# Altium PCB gateway.PcbDoc
Units mil, origin at the board's own origin, x right, y up, seen from the top; angles counter-clockwise.
Board outline 2775 x 2425 mil, 2 copper layers (Top Layer, Bottom Layer); 5 components, 8 nets, 63 pads, 0 vias.
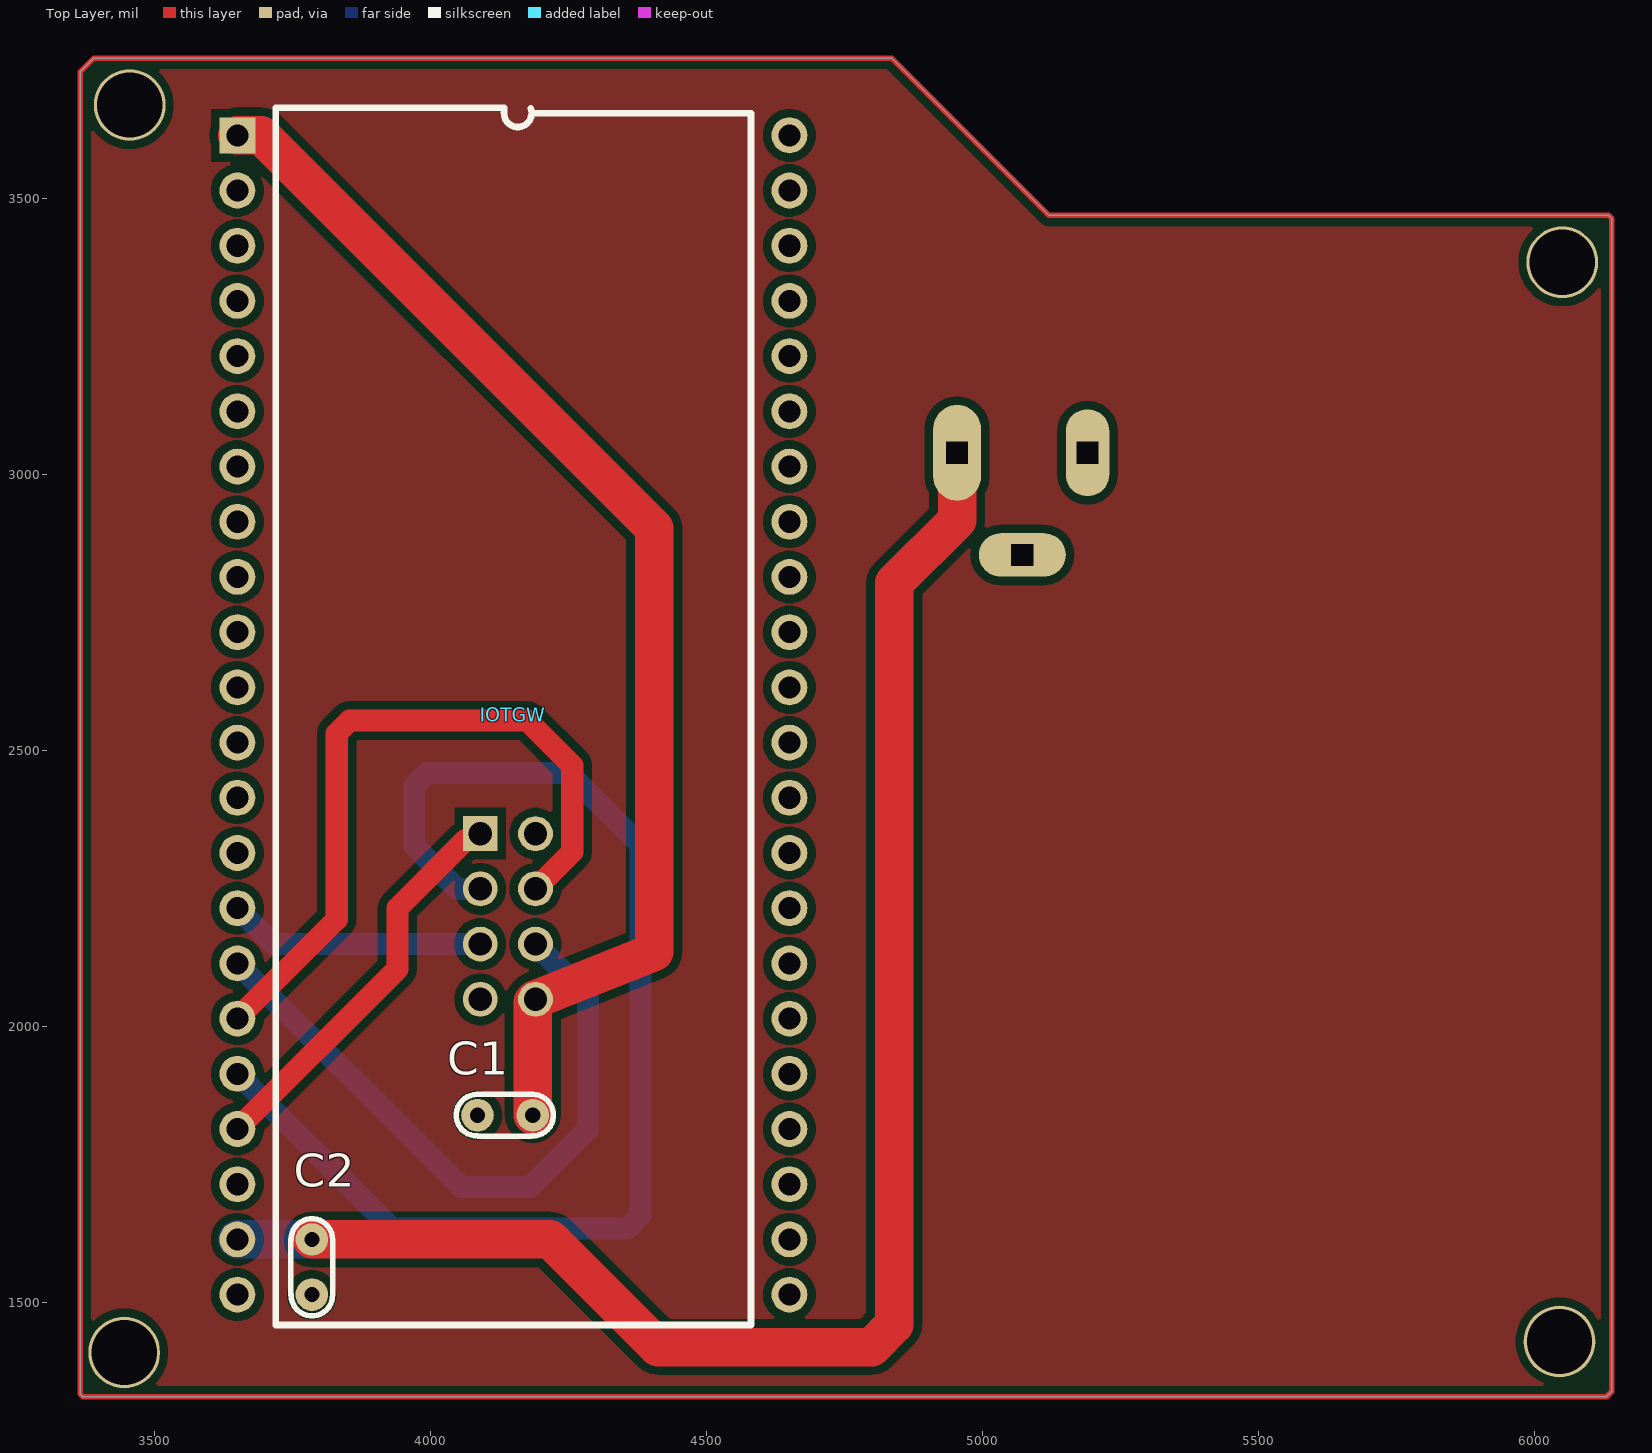
[diagram p0: Top Layer view]
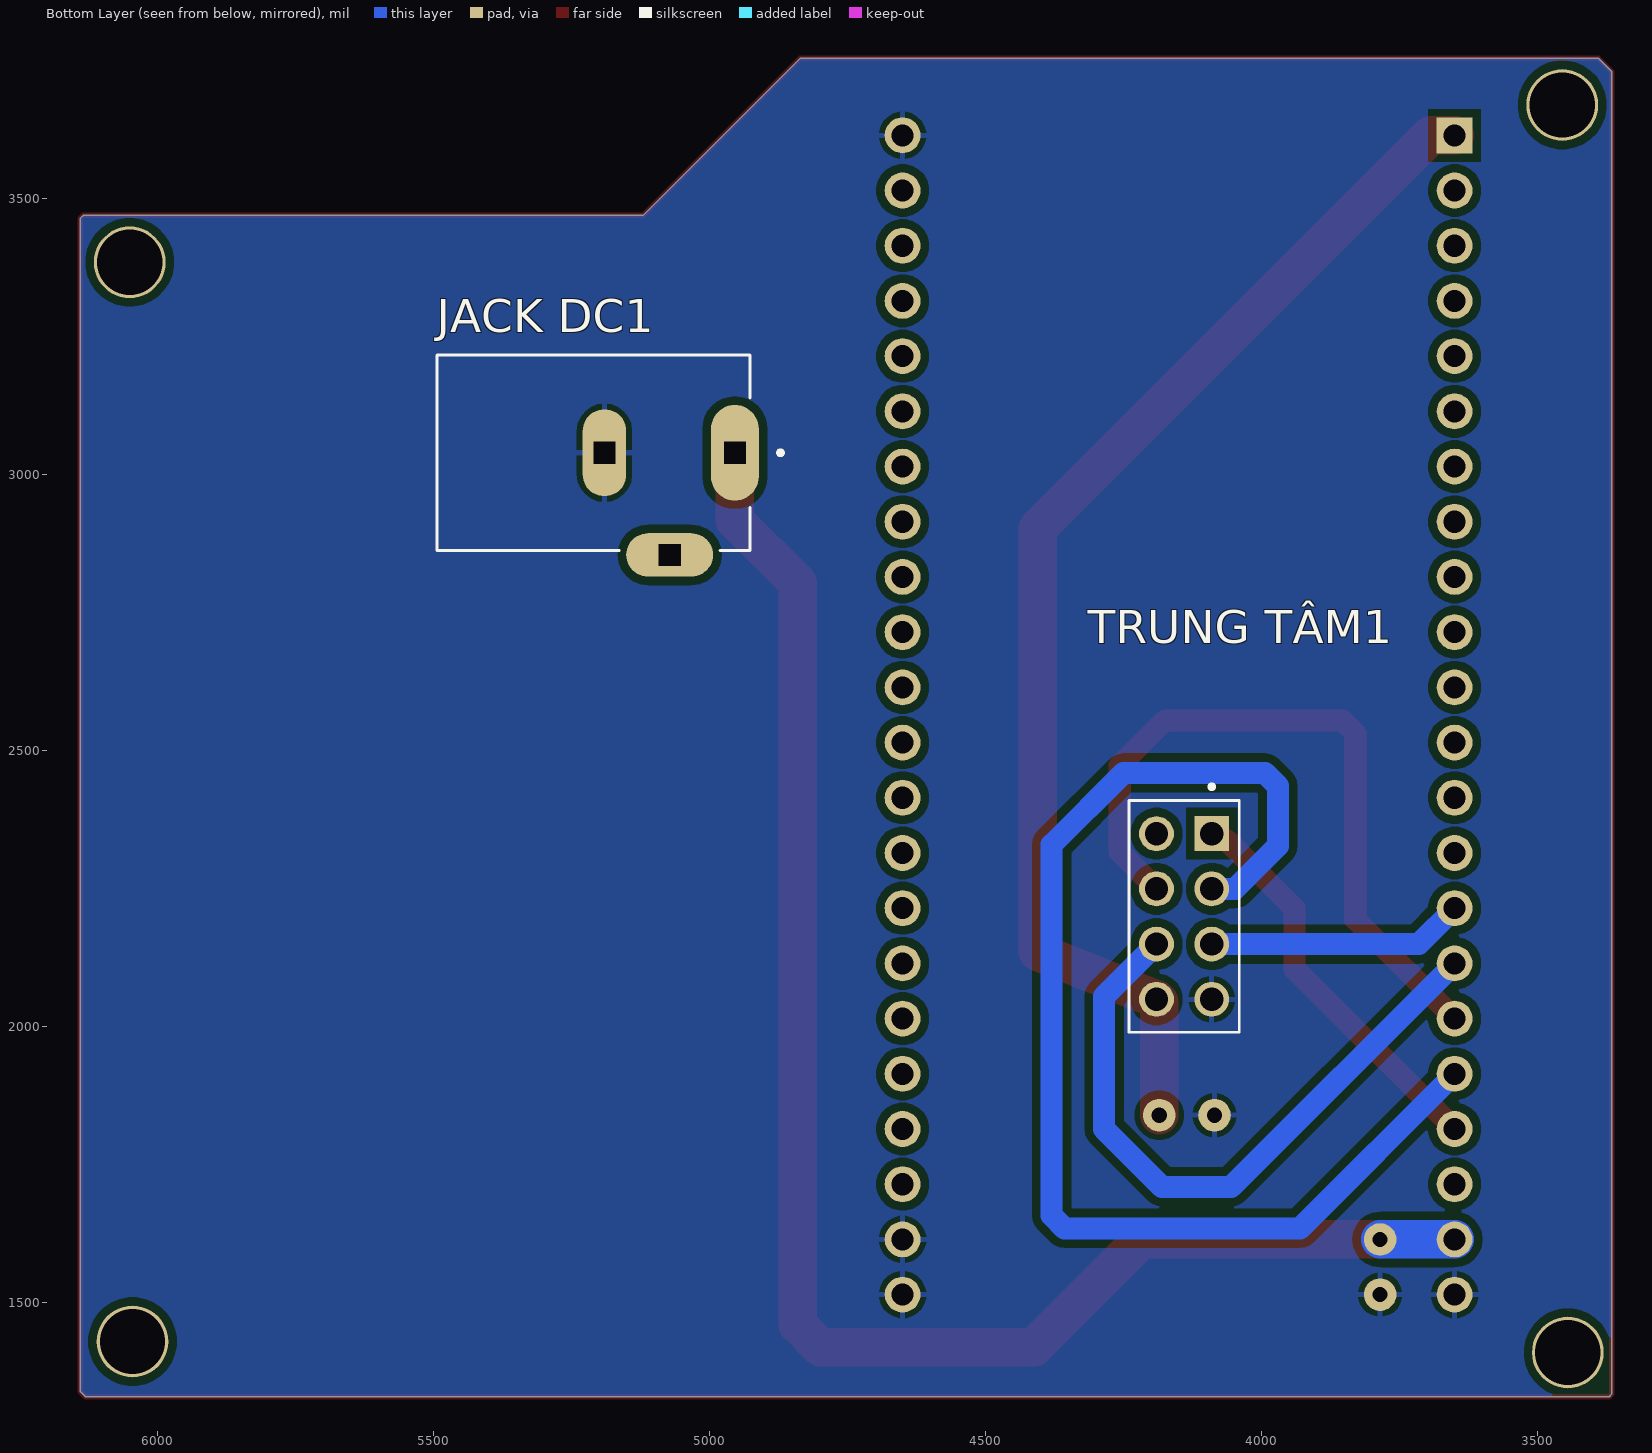
[diagram p1: Bottom Layer view, seen from below]

## Layer stack, top to bottom
Top Solder: solder mask 0.4, Solder Resist, Dk 3.5
Top Layer: signal copper 1.4
Dielectric 1: dielectric 12.6, FR-4, Dk 4.8
Bottom Layer: signal copper 1.4
Bottom Solder: solder mask 0.4, Solder Resist, Dk 3.5

## Board outline
3365,1335 3370,1330 6130,1330 6140,1340 6140,3464.14 6134.14,3470 5120,3470 4835,3755 3390,3755 3365,3730

## Design rules (kind name [scope] priority, off if disabled: settings)
Clearance [All] p1: gap=15 ignorepadtopadclearanceinfootprint=FALSE
PolygonConnect [All] p1: connectstyle=Relief reliefconductorwidth=10 reliefentries=4 polygonreliefangle="90 Angle" airgapwidth=10
RoutingVias [All] p1: holewidth=28 width=50 viastyle="Through Hole" minholewidth=28 minwidth=50 maxholewidth=28 maxwidth=50
SolderMaskExpansion [All] p1: expansion=4 istentingtop=FALSE
Width 3V3 [InNet('VCC 3v')] p1: maxlimit=80 minlimit=60 preferedwidth=70
Width VCC [InNet('5V')] p2: maxlimit=80 minlimit=60 preferedwidth=70
Width GND [InNet('GND')] p3: maxlimit=80 minlimit=60 preferedwidth=70
Width [All] p4: maxlimit=50 minlimit=30 preferedwidth=40
30 further rules are at their usual default settings.

## Components (designator, comment, footprint, x,y, rotation, side; value= is the part's Value field where it differs from the comment)
C1 "104" "tu gom" 4135,1840 r0 top
C2 "104" "tu gom" 3785,1565 r90 top
IOTGW "Component_1" ESP32_S3_N16R8_44 3527.95,3840 r0 top
"JACK DC1" "JACK DC 5.5" XKB_DC-005-5A-2.0 5190,3040 r180 bottom value="Jac DC"
"TRUNG TÂM1" "ra_SX1278" SULLINS_PPPC042LFBN-RC 4140,2200 r90 bottom

## Footprints (in the part's own frame and the unit in brackets; to place one, negate y for a bottom-side part, rotate by r counter-clockwise, add the part's x,y. Pads: shape width x height; smd on the part's side, far side on the other; paste and mask are expansions set on the pad)
ESP32_S3_N16R8_44 [mil]
  round 65 hole 40: 0(1122.05,-1525) 1(1122.05,-525) 2(1122.05,-625) 3(122.05,-1425) 4(122.05,-525) 5(122.05,-625) 6(122.05,-725) 7(122.05,-825) 8(122.05,-1325) 9(122.05,-1625) 10(122.05,-1725) 11(122.05,-1825) 12(122.05,-1925) 13(122.05,-2025) 14(122.05,-2125) 15(122.05,-925) 16(122.05,-1025) 17(122.05,-1125) 18(122.05,-1225) 19(1122.05,-2125) 20(1122.05,-2025) 21(1122.05,-1925) 22(122.05,-2325) 23(1122.05,-2325) 24(1122.05,-2225) 35(1122.05,-1425) 36(1122.05,-1325) 37(1122.05,-1225) 38(1122.05,-1125) 39(1122.05,-1025) 40(1122.05,-925) 41(1122.05,-825) 42(1122.05,-725) 43(1122.05,-325) 44(1122.05,-225) 45(1122.05,-1625) 46(122.05,-1525) 47(1122.05,-1825) 48(1122.05,-1725) 50(1122.05,-425) 52(122.05,-325) 53(122.05,-425) 54(122.05,-2225)
  rect 65x65 hole 40: 51(122.05,-225)
  silkscreen extent 192,-2380 1053,-175, body extent 75,-2403 1175,93, height 679
SULLINS_PPPC042LFBN-RC [mm]
  rect 1.605x1.605 / inner round 1.605 / far side rect 1.605x1.605 hole 1.07: 1(3.81,-1.27)
  round 1.605 hole 1.07: 2(1.27,-1.27) 3(-1.27,-1.27) 4(-3.81,-1.27) 5(-3.81,1.27) 6(-1.27,1.27) 7(1.27,1.27) 8(3.81,1.27)
  silkscreen extent -5.33,-2.54 6.07,2.54, body extent -5.33,-2.54 5.33,2.54, height 8.51
"tu gom" [mm] "Tu gom mini"
  round 1.5 hole 0.7: 1(-1.27,0) 2(1.27,0)
  silkscreen extent -2.25,-0.97 2.22,0.97, body extent -2.92,-0.85 2.92,0.85, height 6.12
XKB_DC-005-5A-2.0 [mm]
  oval 2.2x4.4 hole 1 square: 1(6,0)
  oval 2x4 hole 1 square: 2(0,0)
  oval 4x2 hole 1 square: 3(3,-4.7)
  silkscreen extent -7.7,-4.5 8.2,4.5, body extent -7.2,-4.85 7.4,4.5, height 11

## Part data
C1 C2: library part "Tu gom 104 50V", "Cắm", Chung_Loai=Cắm, Don_Vi=Con, Ma_Hang=MH004761, So_Chan=2, Ten_Linh_Kien="Tụ gốm 104 100nF 50V"

## Free pads (board coordinates)
  round 129.92 hole 118.11: 97(3455,3670) 97(6050,3385) 98(3445,1410) 99(6045,1430)

## Nets (pads, with @x,y where several pads share a name; then routed paths per layer and width w, separated by ;. In a path a pad name is that pad's centre, name@x,y a point inside that pad or via, vN(x,y) a via of type N, cw(c..) or ccw(c..) an arc to the next point about the centre after c; other vN are vias at no path point)
5V: "JACK DC1.1" C2.2 IOTGW.54 | length 2913.9
  Top Layer w70: C2.2 4217,1615 4412,1420 4798.99,1420 4840,1461.01 4840,2804.22 4953.78,2918 4953.78,3040
  Bottom Layer w70: IOTGW.54 C2.2
GND: "JACK DC1.2" "TRUNG TÂM1.4" C1.1 C2.1 IOTGW.22 IOTGW.23 IOTGW.24 IOTGW.44
MIA: "TRUNG TÂM1.1" IOTGW.13 | length 726
  Top Layer w40: IOTGW.13 3940,2105 3940,2215 4063.41,2338.41 4078.41,2338.41 4090,2350
MOA: "TRUNG TÂM1.7" IOTGW.11 | length 1312.2
  Top Layer w40: IOTGW.11 3830,2195 3830,2531.57 3853.43,2555 4175,2555 4256.6,2473.4 4256.6,2316.6 4190,2250
NSSA: "TRUNG TÂM1.6" IOTGW.10 | length 1220.6
  Bottom Layer w40: IOTGW.10 4055,1710 4180,1710 4285,1815 4285,2055 4190,2150
RSTA: "TRUNG TÂM1.3" IOTGW.9 | length 466.9
  Bottom Layer w40: IOTGW.9 3715,2150 4090,2150
SCKA: "TRUNG TÂM1.2" IOTGW.12 | length 2261.7
  Bottom Layer w40: IOTGW.12 3930,1635 4356.57,1635 4380,1658.43 4380,2330 4250,2460 3993.43,2460 3970,2436.57 3970,2328 4048,2250 4090,2250
"VCC 3v": "TRUNG TÂM1.5" C1.2 IOTGW.51 | length 2260.6
  Top Layer w70: IOTGW.51 3693,3615 4405,2903 4405,2135.93 4190,2050 4185,2045 C1.2
pads on no net: "JACK DC1.3" "TRUNG TÂM1.8" IOTGW.0 IOTGW.1 IOTGW.2 IOTGW.3 IOTGW.4 IOTGW.5 IOTGW.6 IOTGW.7 IOTGW.8 IOTGW.14 IOTGW.15 IOTGW.16 IOTGW.17 IOTGW.18 IOTGW.19 IOTGW.20 IOTGW.21 IOTGW.35 IOTGW.36 IOTGW.37 IOTGW.38 IOTGW.39 IOTGW.40 IOTGW.41 IOTGW.42 IOTGW.43 IOTGW.45 IOTGW.46 IOTGW.47 IOTGW.48 IOTGW.50 IOTGW.52 IOTGW.53
copper on no net: | length 10206.2
  Top Layer w10: 3365,1335 3365,3730 3390,3755 4835,3755 5120,3470 6134.14,3470 6140,3464.14 6140,1340 6130,1330 3370,1330 3365,1335

## Polygon pours and split planes (outlines as drawn)
GND on Top Layer "GND_L01_P001" (solid, remove dead copper, pour order 1): 3365,3730 3390,3755 4835,3755 5120,3470 6134.14,3470 6140,3464.14 6140,1340 6130,1330 3370,1330 3365,1335
no net on Top Layer "NONET_L01_P000" (solid, pour order 0): 3365,3730 3390,3755 4835,3755 5120,3470 6134.14,3470 6140,3464.14 6140,1340 6130,1330 3370,1330 3365,1335
GND on Bottom Layer "GND_L02_P002" (solid, remove dead copper, pour order 2): 3365,3730 3390,3755 4835,3755 5120,3470 6135,3470 6140,3465 6140,1340 6130,1330 3370,1330 3365,1335